# Altium PCB ESP32_F.PcbDoc
Units mm, origin at the board's own origin, x right, y up, seen from the top; angles counter-clockwise.
Board outline 58.76 x 43.75 mm, 4 copper layers (Top Layer, Int1 (GND), Int2 (GND), Bottom Layer), stack 1.486 mm thick; 46 components, 31 nets, 169 pads, 261 vias.
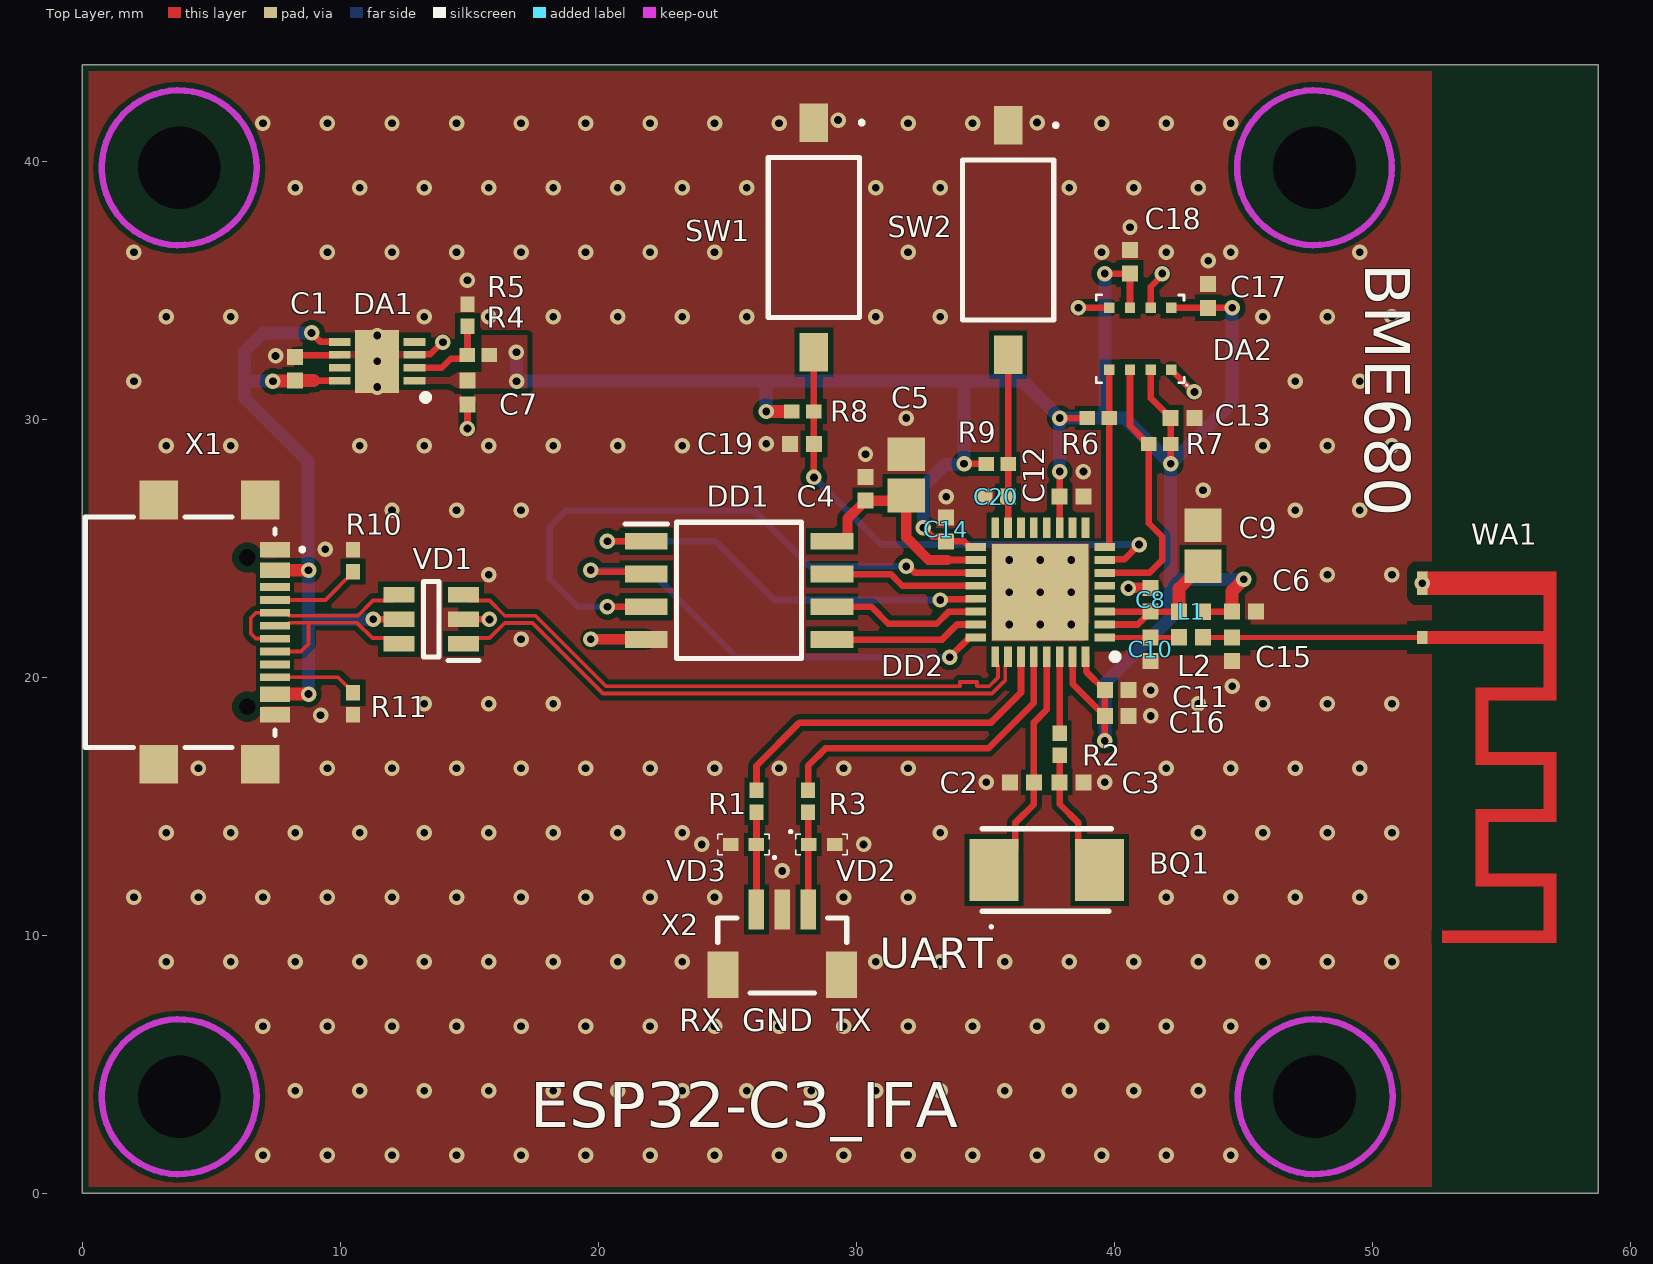
[diagram p0: Top Layer view]
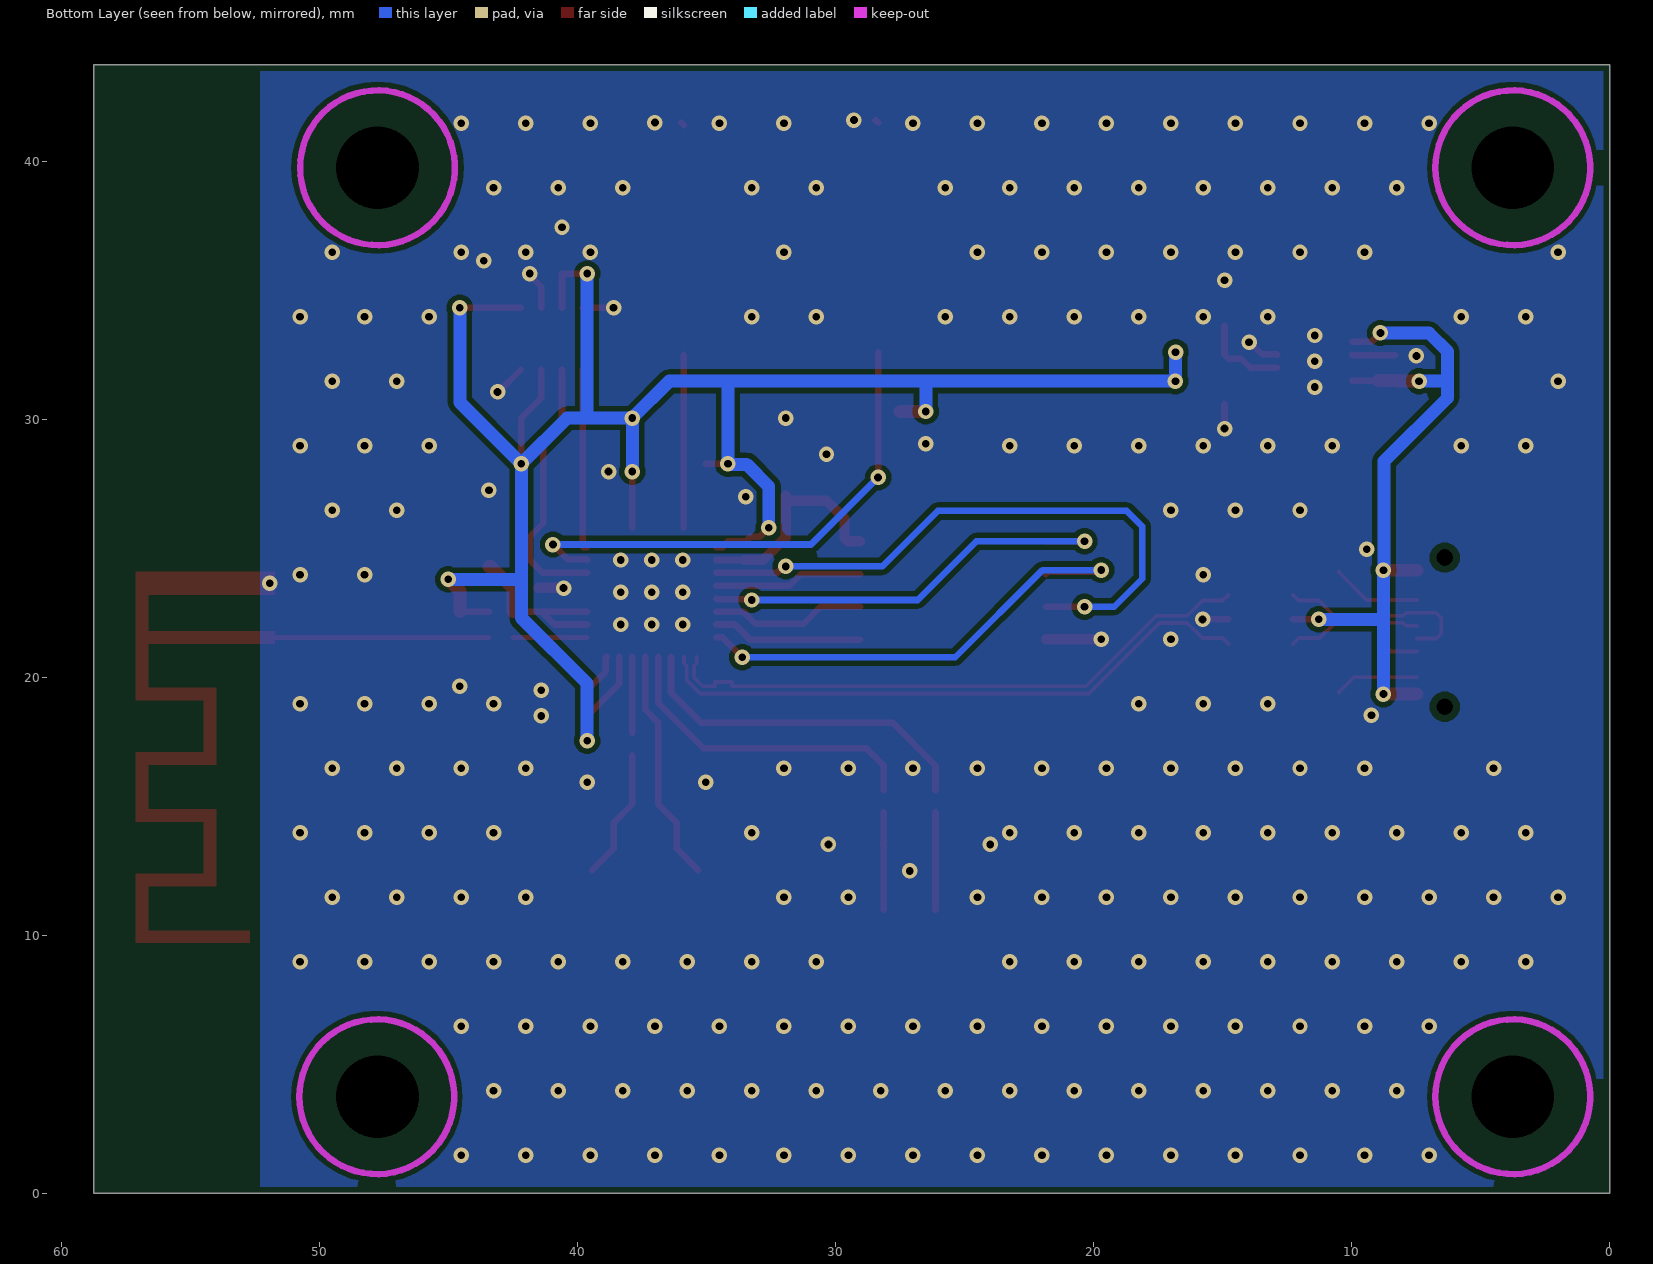
[diagram p1: Bottom Layer view, seen from below]
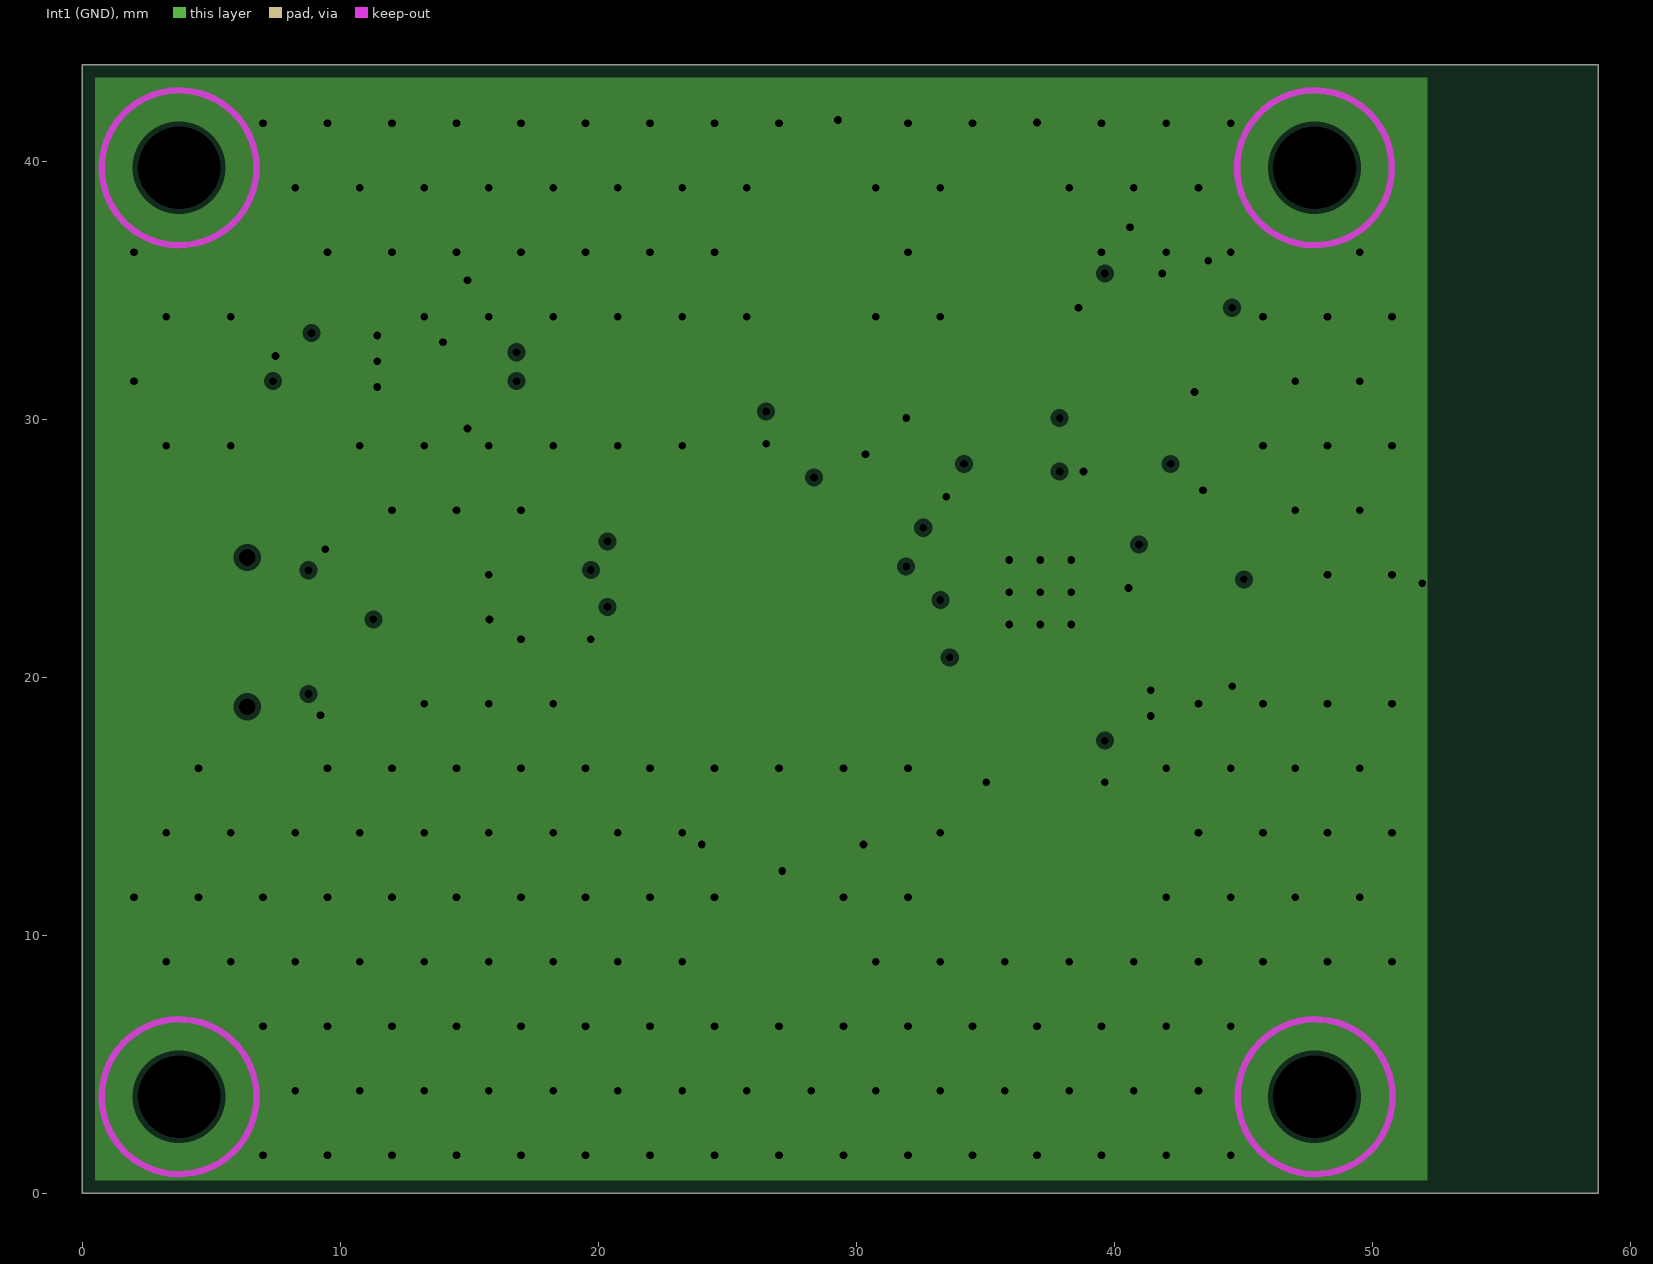
[diagram p2: Int1 (GND), clearances drawn from the general rule]
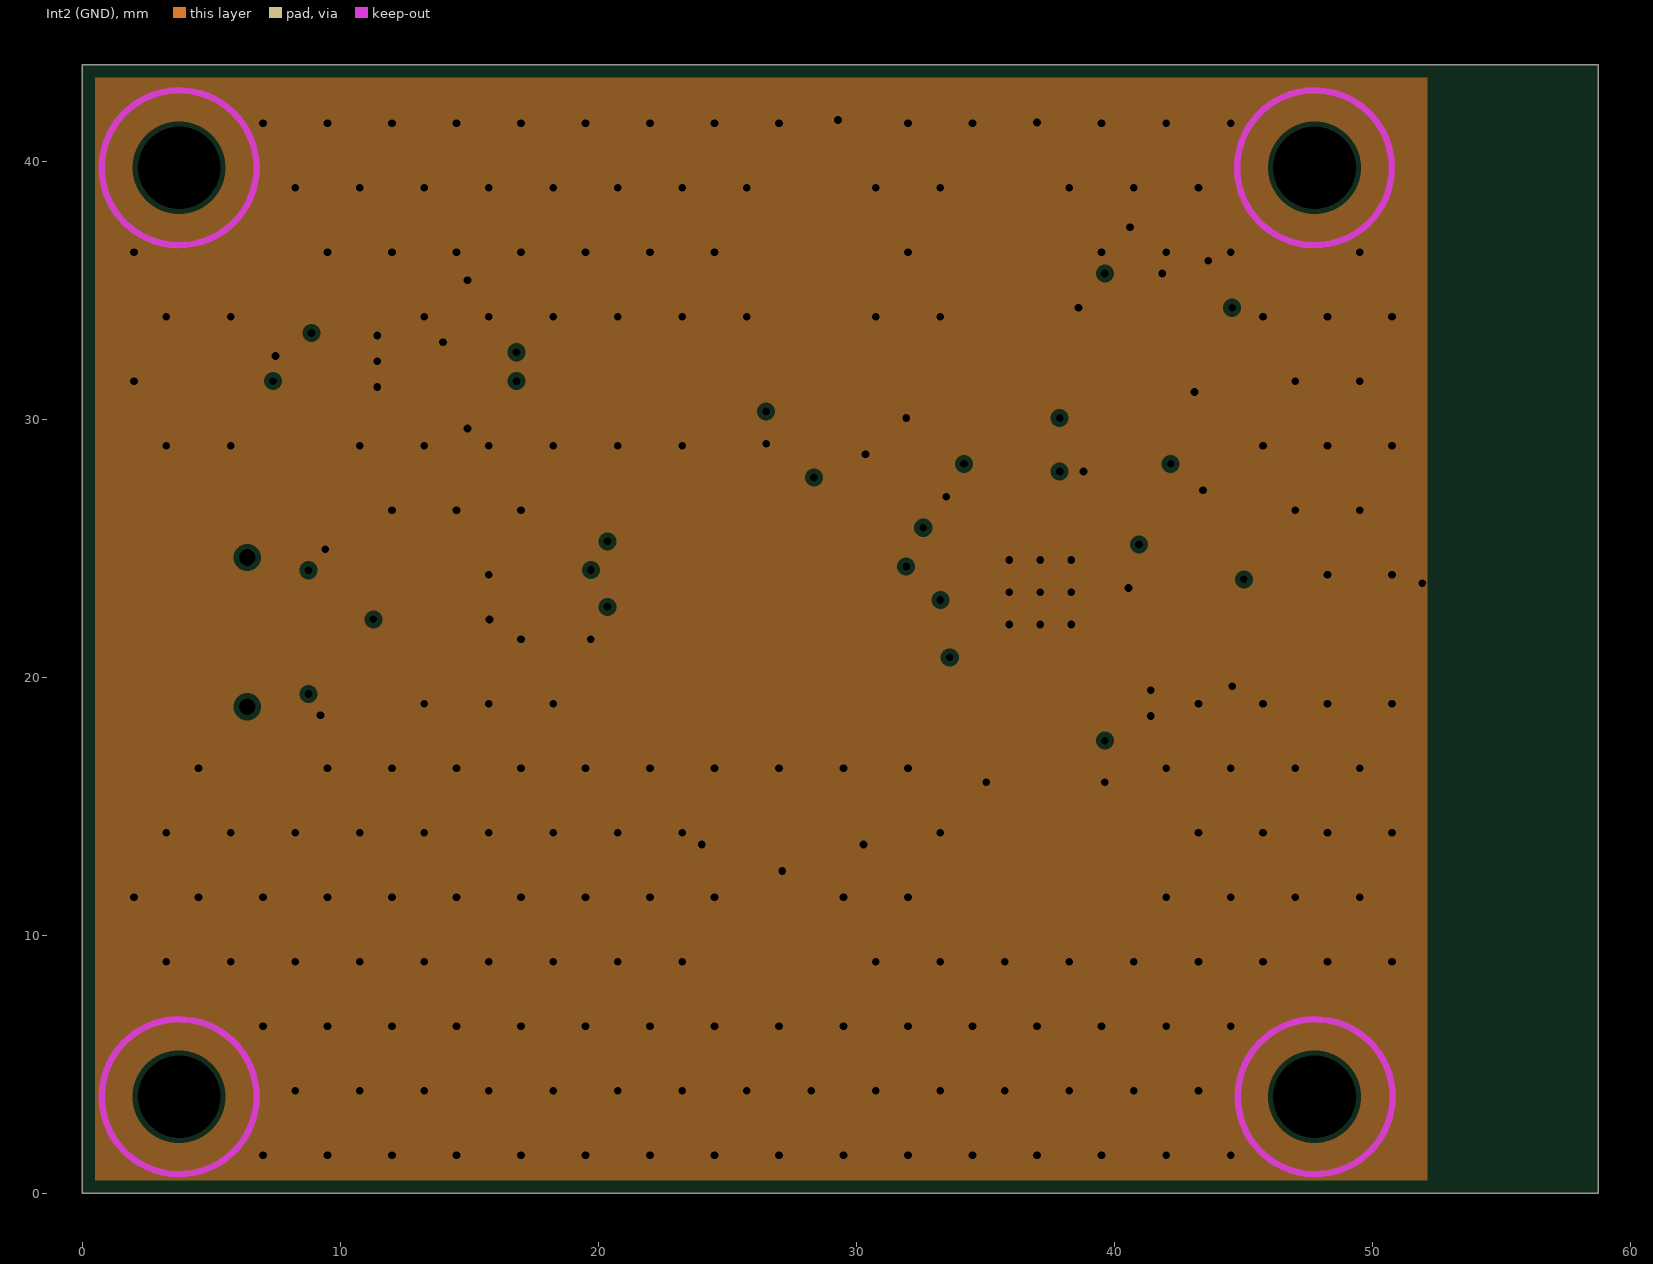
[diagram p3: Int2 (GND), clearances drawn from the general rule]
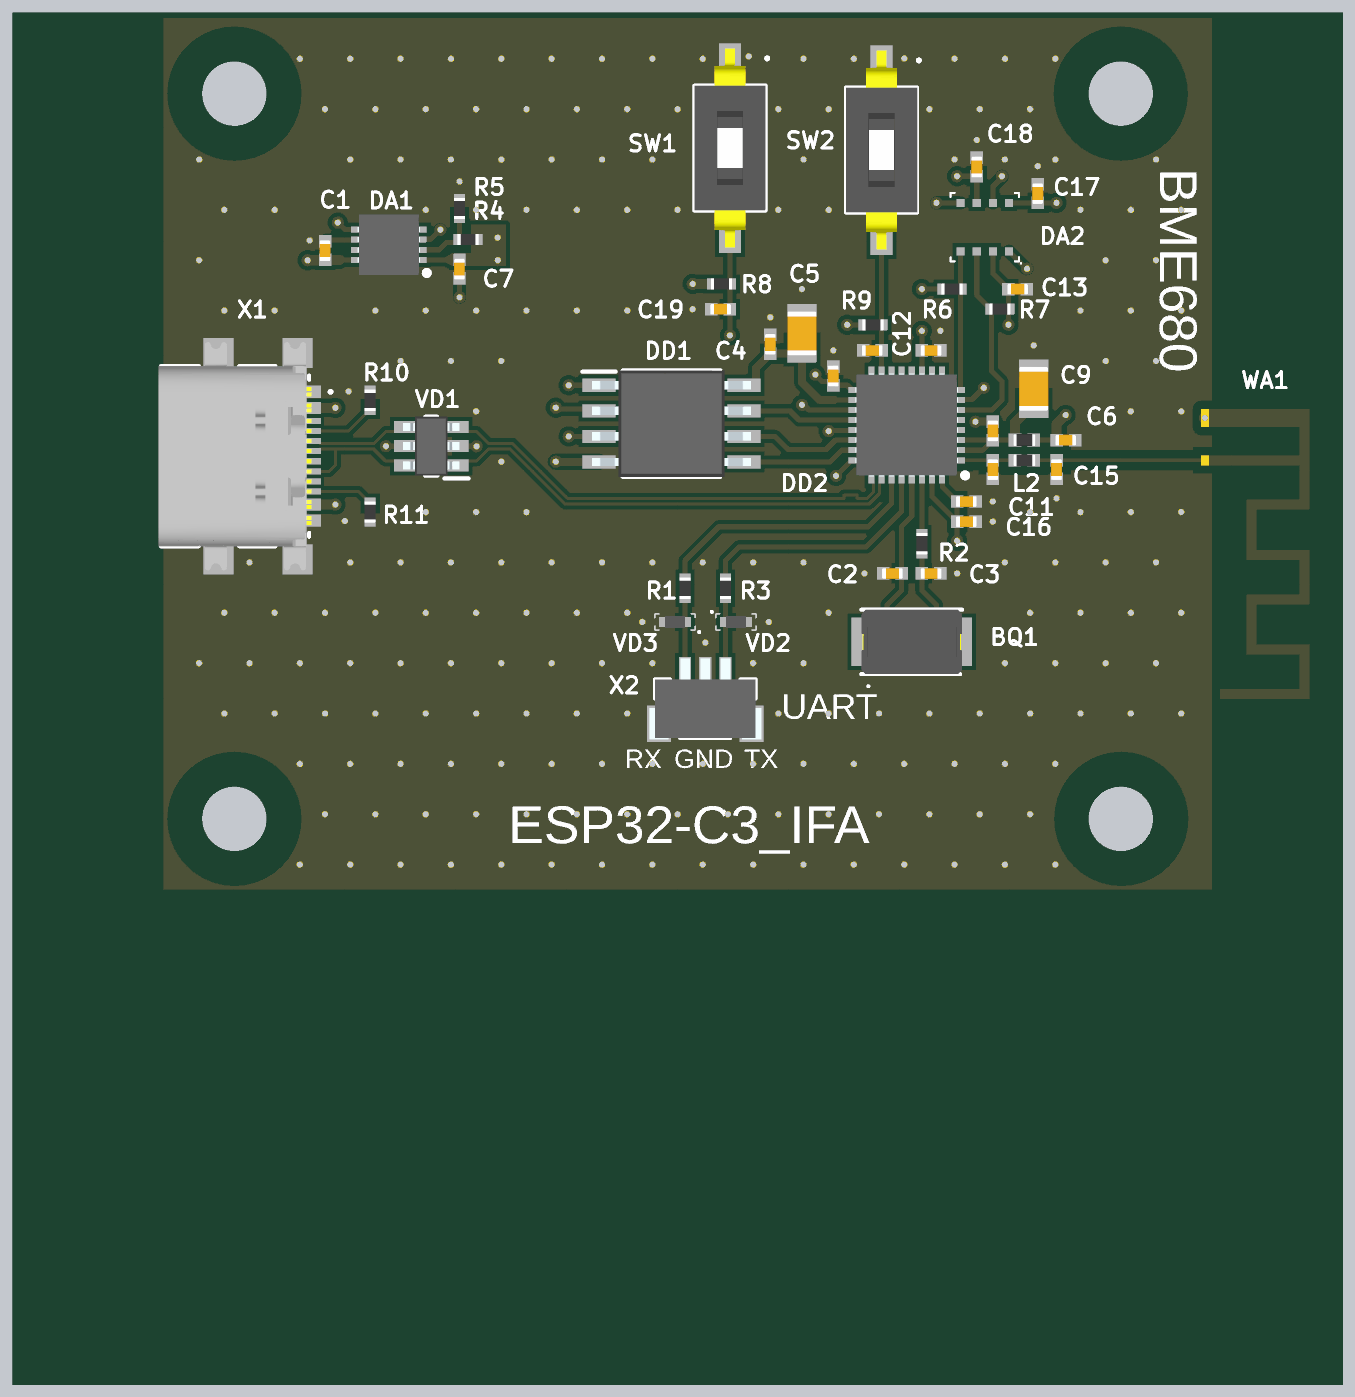
[diagram p4: 3D render of the assembled board from above, using the file's embedded part models]

## Layer stack, top to bottom
Top Solder: solder mask 0.0254, SM-001, Dk 4
Top Layer: signal copper 0.018
Dielectric 1: prepreg 0.125, FR4_HiTg170 PR, Dk 5.07
Int1 (GND): plane copper 0.018, net GND
Dielectric 2: core 1.164, FR4 HiTg170, Dk 4.7
Int2 (GND): plane copper 0.018, net GND
Dielectric 3: prepreg 0.125, FR4_HiTg170 PR, Dk 5.07
Bottom Layer: signal copper 0.018
Bottom Solder: solder mask 0.0254, SM-001, Dk 4

## Board outline
0,0 58.763,0 58.763,43.75 0,43.75

## Design rules (kind name [scope] priority, off if disabled: settings)
AcuteAngle [All] p1: minimum=3.50000000000000E+0001 checktracksonly=FALSE
BoardOutlineClearance "BoardOutlineClearance 1" [All] p1: gap=0.25 ignorepadtopadclearanceinfootprint=FALSE except(0: Arc-SplitContinuation Track-SplitContinuation SMDPad-SplitContinuation THPad-SplitContinuation Via-SplitContinuation Fill-SplitContinuation Poly-SplitContinuation Region-SplitContinuation Text-SplitContinuation) // Milling
BoardOutlineClearance "BoardOutlineClearance 2" [All] p2: gap=0.4 ignorepadtopadclearanceinfootprint=FALSE except(0: Arc-SplitContinuation Track-SplitContinuation SMDPad-SplitContinuation THPad-SplitContinuation Via-SplitContinuation Fill-SplitContinuation Poly-SplitContinuation Region-SplitContinuation Text-SplitContinuation) // V-Cut
Clearance RF [InNetClass('RF') vs InPolygon] p1: gap=0.125 ignorepadtopadclearanceinfootprint=TRUE except(0.2: Track-Fill SMDPad-Fill THPad-Fill Via-Fill Fill-Fill Poly-Region Poly-Text; 0.25: Arc-Hole Track-Hole SMDPad-Hole THPad-Hole Via-Hole Fill-Hole Poly-Hole Region-Hole Text-Hole; 0.4: Arc-Poly Track-Poly SMDPad-Poly THPad-Poly Via-Poly Fill-Poly Poly-Poly)
Clearance USB [InComponent('X1') vs InPolygon] p2: gap=0.1 ignorepadtopadclearanceinfootprint=TRUE except(0.15: Arc-Fill Arc-Poly Track-Fill Track-Poly SMDPad-SMDPad SMDPad-Fill SMDPad-Poly THPad-Fill THPad-Poly Via-Fill Via-Poly Fill-Fill Fill-Poly Poly-Poly Poly-Region Poly-Text; 0.25: Arc-Hole Track-Hole SMDPad-Hole THPad-Hole Via-Hole Fill-Hole Poly-Hole Region-Hole Text-Hole)
Clearance "Clearance-1 1/2 Oz" [All] p3: gap=0.125 ignorepadtopadclearanceinfootprint=TRUE except(0.2: Arc-Poly Track-Fill Track-Poly SMDPad-Fill SMDPad-Poly THPad-Fill THPad-Poly Via-Fill Via-Poly Fill-Fill Fill-Poly Poly-Poly Poly-Region Poly-Text; 0.25: Arc-Hole Track-Hole SMDPad-Hole THPad-Hole Via-Hole Fill-Hole Poly-Hole Region-Hole Text-Hole) // Standart
DiffPairsRouting "DiffPairsRouting 1/2 Oz" [All] p1: maxlimit=0.127 minlimit=0.127 mostfreqgap=0.127 toplayer_minwidth=0.148 toplayer_maxwidth=0.148 toplayer_prefwidth=0.148 bottomlayer_minwidth=0.148 bottomlayer_maxwidth=0.148 bottomlayer_prefwidth=0.148 impedanceprofiledriven=TRUE impedanceprofileid={F14D9792-9E2F-460B-9E6B-1D28D1DFE628} impedanceprofilevalue=90.000000 maxuncoupledlength=12.7
HoleSize "Minimum HoleSize" [IsPad] p1: absolutevalues=TRUE maxlimit=5.9 minlimit=0.6 maxpercent=80.000 minpercent=20.000
HoleSize "Minimum HoleSize VIA 1" [IsVia] p2: absolutevalues=TRUE maxlimit=5.9 minlimit=0.3 maxpercent=80.000 minpercent=20.000 // Standart
HoleSize "Minimum HoleSize VIA 2" [IsVia] p3: absolutevalues=TRUE maxlimit=5.9 minlimit=0.2 maxpercent=80.000 minpercent=20.000 // Advance
HoleToHoleClearance Hole2HoleClearance [All] p1: gap=0.25 allowstackedmicrovias=FALSE
MatchedLengths [InDifferentialPairClass('All Differential Pairs')] p1: tolerance=0.25 checknetsindiffpair=TRUE checkdiffpairvsdiffpair=FALSE checkxsignals=FALSE checkothers=FALSE
MinimumAnnularRing "Minimum AR VIA Standart" [IsVia] p1: minimumring=0.15
MinimumAnnularRing "Minimum AR PAD Standart" [IsPAD] p2: minimumring=0.2
MinimumAnnularRing "Minimum AR VIA Advance" [IsVia] p3: minimumring=0.1
MinimumAnnularRing "Minimum AR PAD Advance" [IsPAD] p4: minimumring=0.15
MinimumSolderMaskSliver "SolderMask Bridge Advance" [All] p1: minsoldermaskwidth=0.1 // Mask LDI
PlaneClearance "PlaneClearance-1 1/2 Oz" [All] p1: clearance=0.2 // Standart
PlaneConnect "TermalConnect-1 1/2 Oz" [All] p1: planeconnectstyle=Direct reliefexpansion=0.2 reliefentries=4 reliefconductorwidth=0.2 reliefairgap=0.2 // Standart
PolygonConnect [InNet('GND') vs InPolygon] p1: thpad.connectstyle=Relief thpad.reliefconductorwidth=0.254 thpad.reliefentries=4 thpad.polygonreliefangle="90 Angle" thpad.airgapwidth=0.254 smdpad.connectstyle=Relief smdpad.reliefconductorwidth=0.254 smdpad.reliefentries=4 smdpad.polygonreliefangle="90 Angle" smdpad.airgapwidth=0.254 via.connectstyle=Direct via.reliefconductorwidth=0.254 via.reliefentries=4 via.polygonreliefangle="90 Angle" via.airgapwidth=0.254
PolygonConnect "PolygonConnect-1 1/2 Oz" [All] p2: connectstyle=Direct reliefconductorwidth=0.15 reliefentries=4 polygonreliefangle="90 Angle" airgapwidth=0.2 // Standart
RoutingCorners [All] p1 off: cornerstyle=45-Degree minsetback=2.54 maxsetback=2.54
RoutingVias [All] p1: holewidth=0.3 width=0.6 viastyle="Through Hole" minholewidth=0.2 minwidth=0.4 maxholewidth=5.9 maxwidth=6.4
ShortCircuit [InComponent('WA1')] p1: allowed=TRUE
ShortCircuit ShortCircuit_1 [All] p2: allowed=FALSE
SilkToSilkClearance Silk2SilkClearance [All] p1 off: silktosilkclearance=0.15
SilkToSolderMaskClearance Silk2SolderMaskClearance [IsPad] p1 off: minsilkscreentomaskgap=0.15 clearancetoexposedcopper=TRUE
SolderMaskExpansion SolderMaskExpansion-1 [IsVia] p1: expansion=0.05 istentingtop=TRUE // Standart
SupplyNets "Schematic Supply Nets_8" [InNet('GPIO9')] p1: voltage=0.000
SupplyNets "Schematic Supply Nets_7" [InNet('3V3_RF')] p2: voltage=0.000
SupplyNets "Schematic Supply Nets_5" [InNet('EN')] p3: voltage=0.000
SupplyNets "Schematic Supply Nets_4" [InNet('GND')] p4: voltage=0.000
SupplyNets "Schematic Supply Nets_3" [InNet('VDD_SPI')] p5: voltage=0.000
SupplyNets "Schematic Supply Nets_2" [InNet('LNA_IN')] p6: voltage=0.000
SupplyNets "Schematic Supply Nets_1" [InNet('VBUS')] p7: voltage=0.000
SupplyNets "Schematic Supply Nets" [InNet('3V3')] p8: voltage=0.000
UnRoutedNet [All] p1: checkbadconnections=TRUE
Width [InNetClass('RF')] p1: maxlimit=0.183 minlimit=0.183 preferedwidth=0.183 impedanceprofiledriven=TRUE impedanceprofileid={AA5DB288-7864-4EBF-8BF9-1DDD22D927DC} impedanceprofilevalue=50.000000 minimp=50.000000 maximp=50.000000 favimp=50.000000
Width "Width 1/2 Oz" [All] p2: maxlimit=10 minlimit=0.1 preferedwidth=0.125 checkconnectedcopper=TRUE
19 further rules are at their usual default settings.

## Classes and differential pairs
net class RF: LNA_IN NetC15_2
differential pair USB_D: +USB_D_P -USB_D_N
differential pair MCU_USB: +MCU_USB_P -MCU_USB_N

## Components (designator, comment, footprint, x,y, rotation, side; value= is the part's Value field where it differs from the comment)
BQ1 "ABM3-40.000MHZ-B2-T" ABM3 37.388,12.535 r0 top
C1 "C_0402" C_0402 8.263,31.96 r270 top value=1uF
C2 "C_0402" C_0402 36.428,15.935 r0 top value=22pF
C3 "C_0402" C_0402 38.348,15.935 r180 top value=22pF
C4 "C_0402" C_0402 30.363,27.31 r90 top value=100nF
C5 "C_0805" C_0805 31.938,27.85 r270 top value=10uF
C6 "C_0402" C_0402 45.033,22.55 r0 top value=100nF
C7 "C_0402" C_0402 14.938,31.04 r90 top value=1uF
C8 "C_0402" C_0402 41.413,23.01 r90 top value=100nF
C9 "C_0805" C_0805 43.443,25.1 r270 top value=10uF
C10 "C_0402" C_0402 41.413,21.09 r270 top value=5pF
C11 "C_0402" C_0402 40.098,19.505 r0 top value=100nF
C12 "C_0402" C_0402 38.348,27.005 r0 top value=100nF
C13 "C_0402" C_0402 42.648,30.05 r0 top value=100nF
C14 "C_0402" C_0402 33.491,25.735 r90 top value=100nF
C15 "C_0402" C_0402 44.573,21.09 r90 top value=4pF
C16 "C_0402" C_0402 40.098,18.505 r0 top value=100nF
C17 "C_0402" C_0402 43.643,34.785 r90 top value=100nF
C18 "C_0402" C_0402 40.613,36.11 r90 top value=100nF
C19 "C_0402" C_0402 27.903,29.05 r180 top value=100nF
C20 "C_0402" C_0402 35.428,27.005 r180 top value=100nF
DA1 "ADP7104ACPZ-R7" SON50P300X300X80-9N-D 11.437,32.25 r180 top
DA2 "BME680" LGA-8 42.513,31.625 r270 top
DD1 "W25Q64JVSSIQ" SOIC127P790X216-8N 25.463,23.37 r0 top
DD2 "ESP32-C3" QFN50P500X500X90-33N-D 37.138,23.3 r180 top
L1 "L_0805" L_0402 42.978,22.55 r180 top value=2n2
L2 "L_0402" L_0402 42.978,21.55 r0 top value=1n8
R1 "R_0402" R_0402 28.138,15.2 r90 top value=470
R2 "R_0402" R_0402 37.888,17.41 r90 top value=22
R3 "R_0402" R_0402 26.138,15.2 r90 top value=470
R4 "R_0402" R_0402 15.363,32.5 r0 top value=47k
R5 "R_0402" R_0402 14.938,34.042 r270 top value=27k
R6 "R_0402" R_0402 39.388,30.05 r0 top value=4.7k
R7 "R_0402" R_0402 41.763,29.05 r180 top value=4.7k
R8 "R_0402" R_0402 27.938,30.305 r0 top value=5.1kOhm
R9 "R_0402" R_0402 35.463,28.275 r0 top value=5.1kOhm
R10 "R_0402" R_0402 10.505,24.528 r90 top value=5.1kOhm
R11 "R_0402" R_0402 10.505,18.978 r270 top value=5.1kOhm
SW1 "DS04-254-2-01BK-SMT-TR" DS04-254-2-01BK-SMT-TR 28.363,37.05 r180 top
SW2 "DS04-254-2-01BK-SMT-TR" DS04-254-2-01BK-SMT-TR 35.888,36.95 r180 top
VD1 "USBLC6-2SC6" SOT95P280X145-6N 13.538,22.25 r180 top
VD2 "TPD1E10B06DPY" TPD1E10B06DPYR 28.663,13.525 r0 top
VD3 "TPD1E10B06DPY" TPD1E10B06DPYR 25.638,13.525 r180 top
WA1 "IFA" F_antenna 51.738,23.2 r270 top
X1 "GSB1C41110SSHR" GSB1C41110SSHR 4.088,21.753 r270 top
X2 "3pin_JST" BM03BSRSSTB 27.138,9.225 r0 top

## Footprints (in the part's own frame and the unit in brackets; to place one, negate y for a bottom-side part, rotate by r counter-clockwise, add the part's x,y. Pads: shape width x height; smd on the part's side, far side on the other; paste and mask are expansions set on the pad)
ABM3 [mm]
  rect 1.9x2.4 smd: 1(-2.05,0) 2(2.05,0)
  silkscreen extent -2.5,-2.25 2.5,1.6, body extent -2.5,-1.6 2.5,1.6, height 1.3
BM03BSRSSTB [mm]
  rect 0.6x1.55 smd: 1(1,1.775) 2(0,1.775) 3(-1,1.775)
  rect 1.2x1.8 smd: MP1(2.3,-0.75) MP2(-2.3,-0.75)
  silkscreen extent -2.5,-1.45 2.5,1.45, body extent -2.78,-1.53 2.78,2.49, height 4.35
C_0402 [mm] "Capacitor generic 0402 smd"
  rect 0.62x0.62 smd: 1(-0.46,0) 2(0.46,0)
  body extent -0.53,-0.28 0.53,0.28, height 0.5
C_0805 [mm] "Capacitor generic 0805 smd"
  rect 1.3x1.45 smd: 1(-0.8,0) 2(0.8,0)
  body extent -1.1,-0.72 1.1,0.72, height 0.85
DS04-254-2-01BK-SMT-TR [mm]
  rect 1.1x1.5 smd: 1(0,-4.45) 2(0,4.45)
  silkscreen extent -1.9,-4.5 1.77,3.1, body extent -1.77,-4.95 1.77,4.95, height 4
F_antenna [mm] "IFA_USB"
  rect 0.5x0.4 smd paste-2539.97: 1(1.65,0.2)
  rect 0.9x0.4 smd paste-2539.97: 2(-0.45,0.2)
  Top Layer region: -0.9,4.9 4.1,4.9 4.1,5.4 -0.9,5.4
  Top Layer region: 4.1,2.26 4.1,5.4 3.6,5.4 3.6,2.26
  Top Layer region: 6.6,2.76 3.6,2.76 3.6,2.26 6.6,2.26
  Top Layer region: 6.6,2.26 6.6,5.4 6.1,5.4 6.1,2.26
  Top Layer region: 8.8,5.4 6.1,5.4 6.1,4.9 8.8,4.9
  Top Layer region: 13.5,5.4 10.8,5.4 10.8,4.9 13.5,4.9
  Top Layer region: 11.3,2.76 8.3,2.76 8.3,2.26 11.3,2.26
  Top Layer region: 0,0 0,5.4 -0.9,5.4 -0.9,0
  Top Layer region: 1.9,0 1.9,5.4 1.4,5.4 1.4,0
  Top Layer region: 11.3,2.26 11.3,5.4 10.8,5.4 10.8,2.26
  Top Layer region: 13.5,0.96 13.5,5.4 13,5.4 13,0.96
  Top Layer region: 8.8,2.26 8.8,5.4 8.3,5.4 8.3,2.26
GSB1C41110SSHR [mm]
  rect 0.6x1.15 smd: A1(-3.2,3.39) A4(-2.4,3.39) A9(2.4,3.39) A12(3.2,3.39)
  rect 0.3x1.15 smd: A5(-1.25,3.39) A6(-0.25,3.39) A7(0.25,3.39) A8(1.25,3.39) B5(1.75,3.39) B6(0.75,3.39) B7(-0.75,3.39) B8(-1.75,3.39)
  round 0.325 hole 0.65 unplated: MH1(-2.89,2.315) MH2(2.89,2.315)
  rect 1.5x1.5 smd: MP1(-5.12,2.815) MP2(5.12,2.815) MP3(-5.12,-1.115) MP4(5.12,-1.115)
  silkscreen extent -4.47,-3.97 4.47,4.5, body extent -5.67,-4.09 5.67,3.51, height 3.12
L_0402 [mm] "Chip Inductor, 2-Leads, Body 1,00x0,50mm, IPC Medium Density"
  rect 0.63x0.64 smd: 1(-0.465,0) 2(0.465,0)
  body extent -0.55,-0.3 0.55,0.3, height 0.6
LGA-8 [mm] "Low power gas, pressure, temperature & humidity / sensor"
  rect 0.4x0.4 smd: 1(-0.3,-0.3) 2(-0.3,-1.1) 3(-0.3,-1.9) 4(-0.3,-2.7) 5(-2.7,-2.7) 6(-2.7,-1.9) 7(-2.7,-1.1) 8(-2.7,-0.3)
  silkscreen extent -3.2,-3.2 0.31,0.31
QFN50P500X500X90-33N-D [mm]
  rect 0.8x0.3 smd: 1(-2.5,1.75) 2(-2.5,1.25) 3(-2.5,0.75) 4(-2.5,0.25) 5(-2.5,-0.25) 6(-2.5,-0.75) 7(-2.5,-1.25) 8(-2.5,-1.75) 17(2.5,-1.75) 18(2.5,-1.25) 19(2.5,-0.75) 20(2.5,-0.25) 21(2.5,0.25) 22(2.5,0.75) 23(2.5,1.25) 24(2.5,1.75)
  rect 0.3x0.8 smd: 9(-1.75,-2.5) 10(-1.25,-2.5) 11(-0.75,-2.5) 12(-0.25,-2.5) 13(0.25,-2.5) 14(0.75,-2.5) 15(1.25,-2.5) 16(1.75,-2.5) 25(1.75,2.5) 26(1.25,2.5) 27(0.75,2.5) 28(0.25,2.5) 29(-0.25,2.5) 30(-0.75,2.5) 31(-1.25,2.5) 32(-1.75,2.5)
  rect 3.75x3.75 smd: 33(0,0)
  silkscreen extent -3.03,2.38 -2.78,2.62, body extent -2.55,-2.55 2.55,2.55, height 0.9
R_0402 [mm] "Chip Resistor, 2-Leads, Body 1,00x0,50mm, IPC Medium Density"
  rect 0.6x0.55 smd: 1(-0.425,0) 2(0.425,0)
  body extent -0.53,-0.28 0.53,0.28, height 0.4
SOIC127P790X216-8N [mm]
  rect 1.65x0.65 smd: 1(-3.6,1.905) 2(-3.6,0.635) 3(-3.6,-0.635) 4(-3.6,-1.905) 5(3.6,-1.905) 6(3.6,-0.635) 7(3.6,0.635) 8(3.6,1.905)
  silkscreen extent -4.43,-2.64 2.42,2.64, body extent -3.95,-2.64 3.95,2.64, height 2.16
SON50P300X300X80-9N-D [mm]
  rect 0.85x0.3 smd: 1(-1.45,0.75) 2(-1.45,0.25) 3(-1.45,-0.25) 4(-1.45,-0.75) 5(1.45,-0.75) 6(1.45,-0.25) 7(1.45,0.25) 8(1.45,0.75)
  rect 1.7x2.44 smd: 9(0,0)
  silkscreen extent -2,1.28 -1.75,1.52, body extent -1.55,-1.5 1.55,1.5, height 0.8
SOT95P280X145-6N [mm]
  rect 1.2x0.6 smd: 1(-1.25,0.95) 2(-1.25,0) 3(-1.25,-0.95) 4(1.25,-0.95) 5(1.25,0) 6(1.25,0.95)
  silkscreen extent -1.85,-1.46 0.3,1.6, body extent -1.4,-1.46 1.4,1.46, height 1.45
TPD1E10B06DPYR [mm] "TVS Diode TPD1E10B06DPYR"
  rect 0.6x0.5 smd: 1(-0.5,0) 2(0.5,0)
  silkscreen extent -1.25,-0.4 1,0.55, body extent -0.5,-0.3 0.5,0.3, height 0.38

## Part data
BQ1: "Crystal or Oscillator", Manufacturer_Name=ABRACON, Datasheet Link=https://abracon.com/Resonators/abm3.pdf, Height=1.3mm, Manufacturer_Part_Number=ABM3-40.000MHZ-B2-T
C1 C7: "Capacitor generic 0402 smd", Dielecric=X7R, Manufacturer="Kyecera AVX", Package_size=0402, Tolerance=10, Voltage_rating=25, Part_number=CM105X7R105K25AT
C2 C3: "Capacitor generic 0402 smd", Dielecric=C0G(NP0), Manufacturer=Murata, Package_size=0402, Tolerance=2%, Voltage_rating=16, Part_number=GJM0225C1C220GB01L
C4 C6 C8 C11 C12 C13 C14 C16 C17 C18 C19 C20: "Capacitor generic 0402 smd", Dielecric=X7R, Manufacturer=Yageo, Package_size=0402, Tolerance=10, Voltage_rating=25, Part_number=AC0402KRX7R8BB104
C5 C9: "Capacitor generic 0805 smd", Dielecric=X7R, Manufacturer=Yageo, Package_size=0805, Tolerance=10, Voltage_rating=16, Part_number=CC0805KKX7R7BB106
C10 C15: "Capacitor generic 0402 smd", Dielecric=C0G(NP0), Manufacturer=Murata, Package_size=0402, Tolerance=0.1pF, Voltage_rating=25
  C10: Part_number=GJM0225C1E5R0BB01L
  C15: Part_number=GJM0225C1E4R0BB01L
DA1: "CMOS LDO 500mA / input V 3.3V - 20V / output V 1.5 -9 V", Manufactur="Analog Devices", Part_number=ADP7104ACPZ-R7
DA2: "Low power gas, pressure, temperature & humidity / sensor", Manufacturer=Bosch, Parameter 2=BME680
DD1: "NOR Flash (SPI, Dual SPI, Quad SPI)", Manufacturer="Winbond Electronics", Part_number=W25Q64JVSSIQ
DD2: "MCU (SoC) with wifi & bluetooth support", Manufacturer=Espressif, Part_number=ESP32-C3
L1: "induction 0805 smd", Current_rating=1A, Manufacturer=Murata, Package_size=0402, Tolerance=0.2nH, Part_number=LQW15AN2N2C10D
L2: "induction  0402 smd", Manufacturer=Murata, Package_size=0402, Tolerance="0.1 nH", Part_number=LQG15HN1N8B02D
R1 R2 R3 R4 R5 R6 R7 R8 R9 R10 R11: "SMD 0402 resistor generic"
VD1: Manufacturer=STMicroelectronics, Part_number=USBLC6-2SC6
VD2 VD3: "ESD Protection Diode in 0402 Package"
WA1: "IFA 2.4 GHz"
X1: "USB-C GSB1C41110SSHR"
X2: "Header 3 pin"

## Free pads (board coordinates)
  round 3 hole 3.2 unplated: MTH2(3.763,3.75) MTH2(3.763,39.75) MTH2(47.763,3.75) MTH2(47.763,39.75)

## Via types
v1: diameter 0.6, hole 0.3, Top Layer to Bottom Layer, tented both sides, 261 vias

## Nets (pads, with @x,y where several pads share a name; then routed paths per layer and width w, separated by ;. In a path a pad name is that pad's centre, name@x,y a point inside that pad or via, vN(x,y) a via of type N, cw(c..) or ccw(c..) an arc to the next point about the centre after c; other vN are vias at no path point)
3V3: C6.1 C7.2 C11.1 C12.1 C13.1 C14.1 C16.1 C17.1 C18.1 DA1.1 DA2.2 DA2.6 DA2.8 DD2.11 DD2.17 DD2.31 DD2.32 L1.1 R4.2 R6.1 R7.1 R8.1 R9.1 | length 90.1
  Top Layer w0.254: v1(32.6,25.8) 32.942,25.458 33.308,25.458 C14.1 34.182,25.275 34.365,25.093 34.365,25.073 34.388,25.05 DD2.17 ; v1(34.182,28.275) R9.1 ; DD2.11 C12.1 v1(37.888,27.975) ; v1(37.888,30.05) R6.1 ; DD2.31 38.388,19.755 C16.1 ; DD2.32 38.911,20.777 38.911,20.232 C11.1 C16.1 ; v1(39.638,17.55) C16.1 ; v1(39.638,35.65) C18.1 DA2.6 ; DA2.2 41.413,30.825 C13.1 R7.1 v1(42.188,28.275) ; DA2.8 C17.1 v1(44.573,34.325) ; L1.1 C6.1
  Top Layer w0.5: v1(26.513,30.305) R8.1 ; C6.1 44.573,23.348 v1(45.025,23.8)
  Bottom Layer w0.5: v1(16.834,32.6) 16.837,32.597 16.837,31.483 v1(16.84,31.48) 26.513,31.48 ; v1(26.513,30.305) 26.513,31.48 ; v1(32.6,25.8) 32.6,27.4 33.456,28.256 34.163,28.256 v1(34.182,28.275) 34.182,31.48 ; v1(37.888,27.975) v1(37.888,30.05) ; v1(39.638,17.55) 39.638,19.761 42.188,22.311 42.188,23.876 ; v1(39.638,35.65) 39.638,30.05 ; v1(44.573,34.325) 44.573,30.66 v1(42.188,28.275) ; v1(45.025,23.8) 42.264,23.8 42.188,23.876 ; 26.513,31.48 34.182,31.48 ; 34.182,31.48 36.458,31.48 v1(37.888,30.05) ; v1(37.888,30.05) 39.638,30.05 ; 39.638,30.05 40.413,30.05 v1(42.188,28.275) ; 42.188,23.876 v1(42.188,28.275)
3V3_RF: C8.1 C9.2 DD2.2 DD2.3 L1.2 | length 7
  Top Layer w0.254: DD2.2 40.913,22.05 C8.1 ; DD2.3 C8.1 ; L1.2 C8.1
  Top Layer w0.5: L1.2 42.513,23.445 43.368,24.3 C9.2
EN: C19.1 DD2.7 R8.2 SW1.2 | length 20.1
  Top Layer w0.254: v1(28.363,27.75) C19.1 R8.2 SW1.2 ; DD2.7 39.661,24.573 40.386,24.573 v1(40.963,25.15)
  Bottom Layer w0.254: v1(28.363,27.75) 30.963,25.15 v1(40.963,25.15)
GND: C1.1 C2.1 C3.1 C4.2 C5.1 C6.2 C7.1 C8.2 C9.1 C10.2 C11.2 C12.2 C13.2 C14.2 C15.1 C16.2 C17.2 C18.2 C19.2 C20.2 DA1.3 DA1.6 DA1.9 DA2.1 DA2.5 DA2.7 DD1.4 DD2.33 R5.1 R10.2 R11.2 SW1.1 SW2.1 VD1.2 VD2.2 VD3.2 WA1.2 X1.A1 X1.A12 X1.MP1 X1.MP2 X1.MP3 X1.MP4 X2.2 X2.MP1 X2.MP2 | length 12.3
  Top Layer w0.254: C1.1@8.32,32.477 9.964,32.477 DA1.6 ; DA1.3 12.91,32.523 13.493,32.523 13.962,32.992 v1(13.987,32.992) ; VD1.2 v1@15.788,22.25 ; v1(14.938,29.642) C7.1 ; DD1.4@21.855,21.473 DD1.4 ; SW1.1 SW1.1@28.463,41.6 ; SW2.1 SW2.1@35.988,41.5 ; v1(38.615,34.325) DA2.5 ; v1@40.556,23.466 v1(40.552,23.462) v1@40.56,23.47 ; DA2.7 41.413,35.137 41.863,35.587 v1(41.863,35.65) ; DA2.1 43.076,31.062 v1(43.108,31.062)
  Top Layer w0.4: v1(19.718,21.48) 19.725,21.473 DD1.4@21.855,21.473 ; v1@40.56,23.47 C8.2@41.51,23.47
  other v1: 7.013,1.48 9.513,1.48 12.013,1.48 14.513,1.48 17.013,1.48 19.513,1.48 22.013,1.48 24.513,1.48 27.013,1.48 29.513,1.48 32.013,1.48 34.513,1.48 37.013,1.48 39.513,1.48 42.013,1.48 44.513,1.48 8.263,3.98 10.763,3.98 13.263,3.98 15.763,3.98 18.263,3.98 20.763,3.98 23.263,3.98 25.763,3.98 28.263,3.98 30.763,3.98 33.263,3.98 35.763,3.98 38.263,3.98 40.763,3.98 43.263,3.98 7.013,6.48 9.513,6.48 12.013,6.48 14.513,6.48 17.013,6.48 19.513,6.48 22.013,6.48 24.513,6.48 27.013,6.48 29.513,6.48 32.013,6.48 34.513,6.48 37.013,6.48 39.513,6.48 42.013,6.48 44.513,6.48 3.263,8.98 5.763,8.98 8.263,8.98 10.763,8.98 13.263,8.98 15.763,8.98 18.263,8.98 20.763,8.98 23.263,8.98 30.763,8.98 33.263,8.98 35.763,8.98 38.263,8.98 40.763,8.98 43.263,8.98 45.763,8.98 48.263,8.98 50.763,8.98 2.013,11.48 4.513,11.48 7.013,11.48 9.513,11.48 12.013,11.48 14.513,11.48 17.013,11.48 19.513,11.48 22.013,11.48 24.513,11.48 29.513,11.48 32.013,11.48 42.013,11.48 44.513,11.48 47.013,11.48 49.513,11.48 27.138,12.5 24.013,13.525 30.288,13.525 3.263,13.98 5.763,13.98 8.263,13.98 10.763,13.98 13.263,13.98 15.763,13.98 18.263,13.98 20.763,13.98 23.263,13.98 33.263,13.98 43.263,13.98 45.763,13.98 48.263,13.98 50.763,13.98 35.038,15.935 39.638,15.935 4.513,16.48 9.513,16.48 12.013,16.48 14.513,16.48 17.013,16.48 19.513,16.48 22.013,16.48 24.513,16.48 27.013,16.48 29.513,16.48 32.013,16.48 42.013,16.48 44.513,16.48 47.013,16.48 49.513,16.48 41.413,18.505 9.246,18.537 13.263,18.98 15.763,18.98 18.263,18.98 43.263,18.98 45.763,18.98 48.263,18.98 50.763,18.98 41.413,19.505 44.573,19.66 17.013,21.48 35.938,22.05 37.138,22.05 38.338,22.05 15.788,22.245 35.938,23.3 37.138,23.3 38.338,23.3 51.938,23.65 15.763,23.98 48.263,23.98 50.763,23.98 35.938,24.55 37.138,24.55 38.338,24.55 9.43,24.968 12.013,26.48 14.513,26.48 17.013,26.48 47.013,26.48 49.513,26.48 33.491,27.005 43.443,27.25 38.808,27.975 30.363,28.65 3.263,28.98 5.763,28.98 10.763,28.98 13.263,28.98 15.763,28.98 18.263,28.98 20.763,28.98 23.263,28.98 45.763,28.98 48.263,28.98 50.763,28.98 26.513,29.05 31.938,30.05 11.437,31.25 2.013,31.48 47.013,31.48 49.513,31.48 11.437,32.25 7.5,32.46 11.437,33.25 3.263,33.98 5.763,33.98 13.263,33.98 15.763,33.98 18.263,33.98 20.763,33.98 23.263,33.98 25.763,33.98 30.763,33.98 33.263,33.98 45.763,33.98 48.263,33.98 50.763,33.98 14.938,35.392 43.643,36.15 2.013,36.48 9.513,36.48 12.013,36.48 14.513,36.48 17.013,36.48 19.513,36.48 22.013,36.48 24.513,36.48 32.013,36.48 39.513,36.48 42.013,36.48 44.513,36.48 49.513,36.48 40.613,37.45 8.263,38.98 10.763,38.98 13.263,38.98 15.763,38.98 18.263,38.98 20.763,38.98 23.263,38.98 25.763,38.98 30.763,38.98 33.263,38.98 38.263,38.98 40.763,38.98 43.263,38.98 7.013,41.48 9.513,41.48 12.013,41.48 14.513,41.48 17.013,41.48 19.513,41.48 22.013,41.48 24.513,41.48 27.013,41.48 32.013,41.48 34.513,41.48 39.513,41.48 42.013,41.48 44.513,41.48 37.013,41.5 29.3,41.6
GPIO9: C20.1 DD2.15 R9.2 SW2.2 | length 6.7
  Top Layer w0.254: DD2.15 C20.1 R9.2 SW2.2
LNA_IN: C10.1 DD2.1 L2.1 | length 2.9
  Top Layer w0.183: DD2.1 C10.1 L2.1
MCU_USB_N: DD2.25 VD1.3 | length 23.5
  Top Layer w0.148: VD1.3 15.013,22.974 15.794,22.974 16.381,22.388 17.575,22.388 20.306,19.657 33.947,19.657 34.021,19.657 34.021,19.822 34.677,19.822 34.677,19.657 34.995,19.657 35.157,19.657 35.5,20 35.5,20.438 35.388,20.55 DD2.25
MCU_USB_P: DD2.26 VD1.1 | length 23.6
  Top Layer w0.148: VD1.1 15.013,21.526 15.794,21.526 16.381,22.112 17.461,22.112 20.192,19.382 35.271,19.382 35.775,19.886 35.775,20.438 35.888,20.55 DD2.26
NetBQ1_1: BQ1.1 C2.2 DD2.29 | length 9.1
  Top Layer w0.254: BQ1.1 36.161,13.358 36.161,14.358 36.888,15.085 C2.2 36.888,18.255 37.388,18.755 DD2.29
NetBQ1_2: BQ1.2 C3.2 R2.1 | length 5.1
  Top Layer w0.254: R2.1 C3.2 37.888,15.085 38.615,14.358 38.615,13.358 BQ1.2
NetC15_2: C15.2 L2.2 WA1.1 | length 8.5
  Top Layer w0.183: L2.2 C15.2 WA1.1
NetDA1_2: DA1.2 R4.1 R5.2 | length 3.4
  Top Layer w0.254: DA1.2 13.728,32 13.73,32.002 13.94,32.002 14.29,32.352 14.79,32.352 R4.1 R5.2
NetDA2_3: DA2.3 DD2.6 R7.2 | length 10.3
  Top Layer w0.254: DD2.6 41.363,24.05 41.863,24.55 41.863,25.45 41.338,25.975 R7.2 41.313,29.05 40.613,29.75 DA2.3
NetDA2_4: DA2.4 DD2.8 R6.2 | length 7
  Top Layer w0.254: DD2.8 39.79,25.05 39.813,25.073 R6.2 DA2.4
NetDD1_1: DD1.1 DD2.21 | length 16.7
  Top Layer w0.254: v1(20.363,25.275) DD1.1 ; v1(33.263,23) 33.29,23.027 34.615,23.027 DD2.21
  Bottom Layer w0.254: v1(20.363,25.275) 24.55,25.275 26.825,23 v1(33.263,23)
NetDD1_2: DD1.2 DD2.24 | length 18.9
  Top Layer w0.254: v1(19.718,24.16) 19.784,24.094 21.773,24.094 DD1.2 ; v1(33.627,20.777) 33.627,20.789 34.388,21.55 DD2.24
  Bottom Layer w0.254: v1(19.718,24.16) 21.99,24.16 25.373,20.777 v1(33.627,20.777)
NetDD1_3: DD1.3 DD2.19 | length 24
  Top Layer w0.148: DD2.19@34.625,24.063 DD2.19
  Top Layer w0.254: v1(20.363,22.735) DD1.3 ; v1(31.938,24.3) 32.031,24.3 32.281,24.05 34.613,24.05 DD2.19@34.625,24.063
  Bottom Layer w0.254: v1(20.363,22.735) 19.215,22.735 18.125,23.825 18.125,25.85 18.725,26.45 26.05,26.45 28.2,24.3 v1(31.938,24.3)
NetDD1_5: DD1.5 DD2.23 | length 5.8
  Top Layer w0.254: DD1.5 33.328,21.465 33.913,22.05 DD2.23
NetDD1_6: DD1.6 DD2.22 | length 6
  Top Layer w0.254: DD1.6 30.591,22.735 31.248,22.078 33.122,22.078 33.593,22.55 DD2.22
NetDD1_7: DD1.7 DD2.20 | length 5.8
  Top Layer w0.254: DD1.7 31.338,24.005 31.791,23.552 33.491,23.552 33.493,23.55 DD2.20
NetDD2_27: DD2.27 R3.2 | length 13.8
  Top Layer w0.254: R3.2 26.138,16.58 27.808,18.25 35.226,18.25 36.388,19.411 DD2.27
NetDD2_28: DD2.28 R1.2 | length 12.5
  Top Layer w0.254: R1.2 28.138,16.58 28.808,17.25 35.119,17.25 36.888,19.019 DD2.28
NetDD2_30: DD2.30 R2.2 | length 3
  Top Layer w0.254: R2.2 DD2.30
NetR10_1: R10.1 X1.A5 | length 3.5
  Top Layer w0.148: X1.A5 9.43,23.003 10.505,24.078 R10.1
NetR11_1: R11.1 X1.B5 | length 3.3
  Top Layer w0.148: X1.B5 9.93,20.003 10.505,19.428 R11.1
UART_RX: R3.1 VD3.1 X2.3 | length 3.8
  Top Layer w0.254: X2.3 VD3.1 R3.1
UART_TX: R1.1 VD2.1 X2.1 | length 3.8
  Top Layer w0.254: X2.1 28.15,11.013 28.15,13.512 VD2.1 28.15,13.538 28.15,14.763 R1.1
USB_D_N: VD1.4 X1.A7 X1.B7 | length 7.8
  Top Layer w0.148: X1.A7 6.734,21.503 6.537,21.7 6.537,22.305 6.734,22.503 X1.B7 7.903,22.503 8.015,22.39 10.697,22.39 11.281,22.974 12.062,22.974 VD1.4
USB_D_P: VD1.6 X1.A6 X1.B6 | length 7.4
  Top Layer w0.148: X1.B6 8.48,21.003 8.778,21.3 8.778,22.115 ; X1.A6 7.903,22.003 8.015,22.115 8.778,22.115 ; VD1.6 12.062,21.526 11.251,21.526 10.662,22.115 10.562,22.115 8.982,22.115 8.778,22.115
VBUS: C1.2 DA1.5 DA1.8 VD1.5 X1.A4 X1.A9 | length 28.3
  Top Layer w0.254: v1(8.897,33.348) 9.246,33 DA1.5 ; 8.982,31.5 DA1.8 ; v1(11.288,22.25) VD1.5 VD1.5@12.263,22.275
  Top Layer w0.5: v1(7.4,31.48) C1.2@8.243,31.48 ; X1.A9 v1(8.778,19.353) ; X1.A4 v1(8.778,24.153) ; C1.2 8.982,31.5
  Bottom Layer w0.254: 8.778,22.245 8.783,22.25
  Bottom Layer w0.5: v1(7.4,31.48) 7.397,31.483 6.3,31.483 ; v1(8.778,19.353) 8.778,22.245 v1(8.778,24.153) 8.759,24.172 8.759,24.685 8.755,24.689 8.755,28.375 6.3,30.83 6.3,31.483 ; 8.783,22.25 v1(11.288,22.25) ; v1(8.897,33.348) 7.013,33.348 6.3,32.636 6.3,31.483
VDD_SPI: C4.1 C5.2 DD1.8 DD2.18 | length 8.5
  Top Layer w0.254: 33.538,24.55 DD2.18
  Top Layer w0.4: DD1.8 29.537,25.275 29.662,25.4 29.662,25.874 ; 29.663,25.875 29.663,26.15 C4.1 C5.2@31.738,26.85 ; C5.2 31.938,25.425 32.813,24.55 33.538,24.55
pads on no net: DA1.4 DA1.7 DD2.4 DD2.5 DD2.9 DD2.10 DD2.12 DD2.13 DD2.14 DD2.16 X1.A8 X1.B8 X1.MH1 X1.MH2

## Polygon pours and split planes (outlines as drawn)
GND on Top Layer "GND_L01_P012" (solid, remove dead copper, pour order 12): 0,0 0,43.7 52.3,43.7 52.3,0
3V3 on Top Layer "3V3_L01_P010" (solid, remove dead copper, pour order 10): 12.5,31.625 12.5,31.375 14.222,31.375 14.569,31.2 17.25,31.2 17.25,33.25 15.5,33.25 15.5,31.825 15.497,31.828 14.569,31.828 14.222,31.625 13.401,31.625
GND on Bottom Layer "GND_L04_P013" (solid, remove dead copper, pour order 13): 0,0 0,43.7 52.2,43.7 52.3,43.6 52.3,0
GND on Int2 (GND) (split plane): 52.135,0.51 0.51,0.51 0.51,43.24 52.135,43.24
GND on Int1 (GND) (split plane): 52.135,0.51 0.51,0.51 0.51,43.24 52.135,43.24

## Keep-outs
Keep-Out Layer:
  circle w0.25: c3.763,39.75 r3
  circle w0.25: c3.763,3.75 r3
  circle w0.25: c47.788,3.75 r3
  circle w0.25: c47.763,39.75 r3

## Other copper
Int1 (GND) (plane layer: these items are gaps in the copper):
  pour cut-out: 52.15,43.75 52.15,0 58.775,0 58.775,43.75
  lines w0.05: 52.163,-0.475 58.863,-0.475 58.863,43.851 52.163,43.851 52.163,-0.475
Int2 (GND) (plane layer: these items are gaps in the copper):
  pour cut-out: 52.15,43.75 52.15,0 58.775,0 58.775,43.75
  lines w0.05: 52.163,-0.475 59.213,-0.475 59.213,43.925 52.163,43.925 52.163,-0.475

## Silkscreen, mask and mechanical layers (free items; w line width, h text height)
Top Overlay:
  text "BME680" at 49.152,36.049 h3 r270
  text "UART" at 30.915,8.35 h2
  text "RX" at 23.139,6 h1.5
  text "GND" at 25.594,6 h1.5
  text "TX" at 29.064,6 h1.5
  text "ESP32-C3_IFA" at 17.363,1.989 h3
Board Outline:
  lines w0.05: -7.237,-24.32 -7.237,-23.05 ; 0,0 58.763,0 58.763,43.75 0,43.75 0,0

## Dimensions
3.763,3.75 to 3.763,39.75 on Board Dimensions
3.763,39.75 to 47.763,39.75 on Board Dimensions